# Altium PCB MAX976.PcbDoc
Units mm, origin at the board's own origin, x right, y up, seen from the top; angles counter-clockwise.
Board outline 49.66 x 42.55 mm, 2 copper layers (Top Layer, Bottom Layer); 4 components, 8 nets, 40 pads, 15 vias.
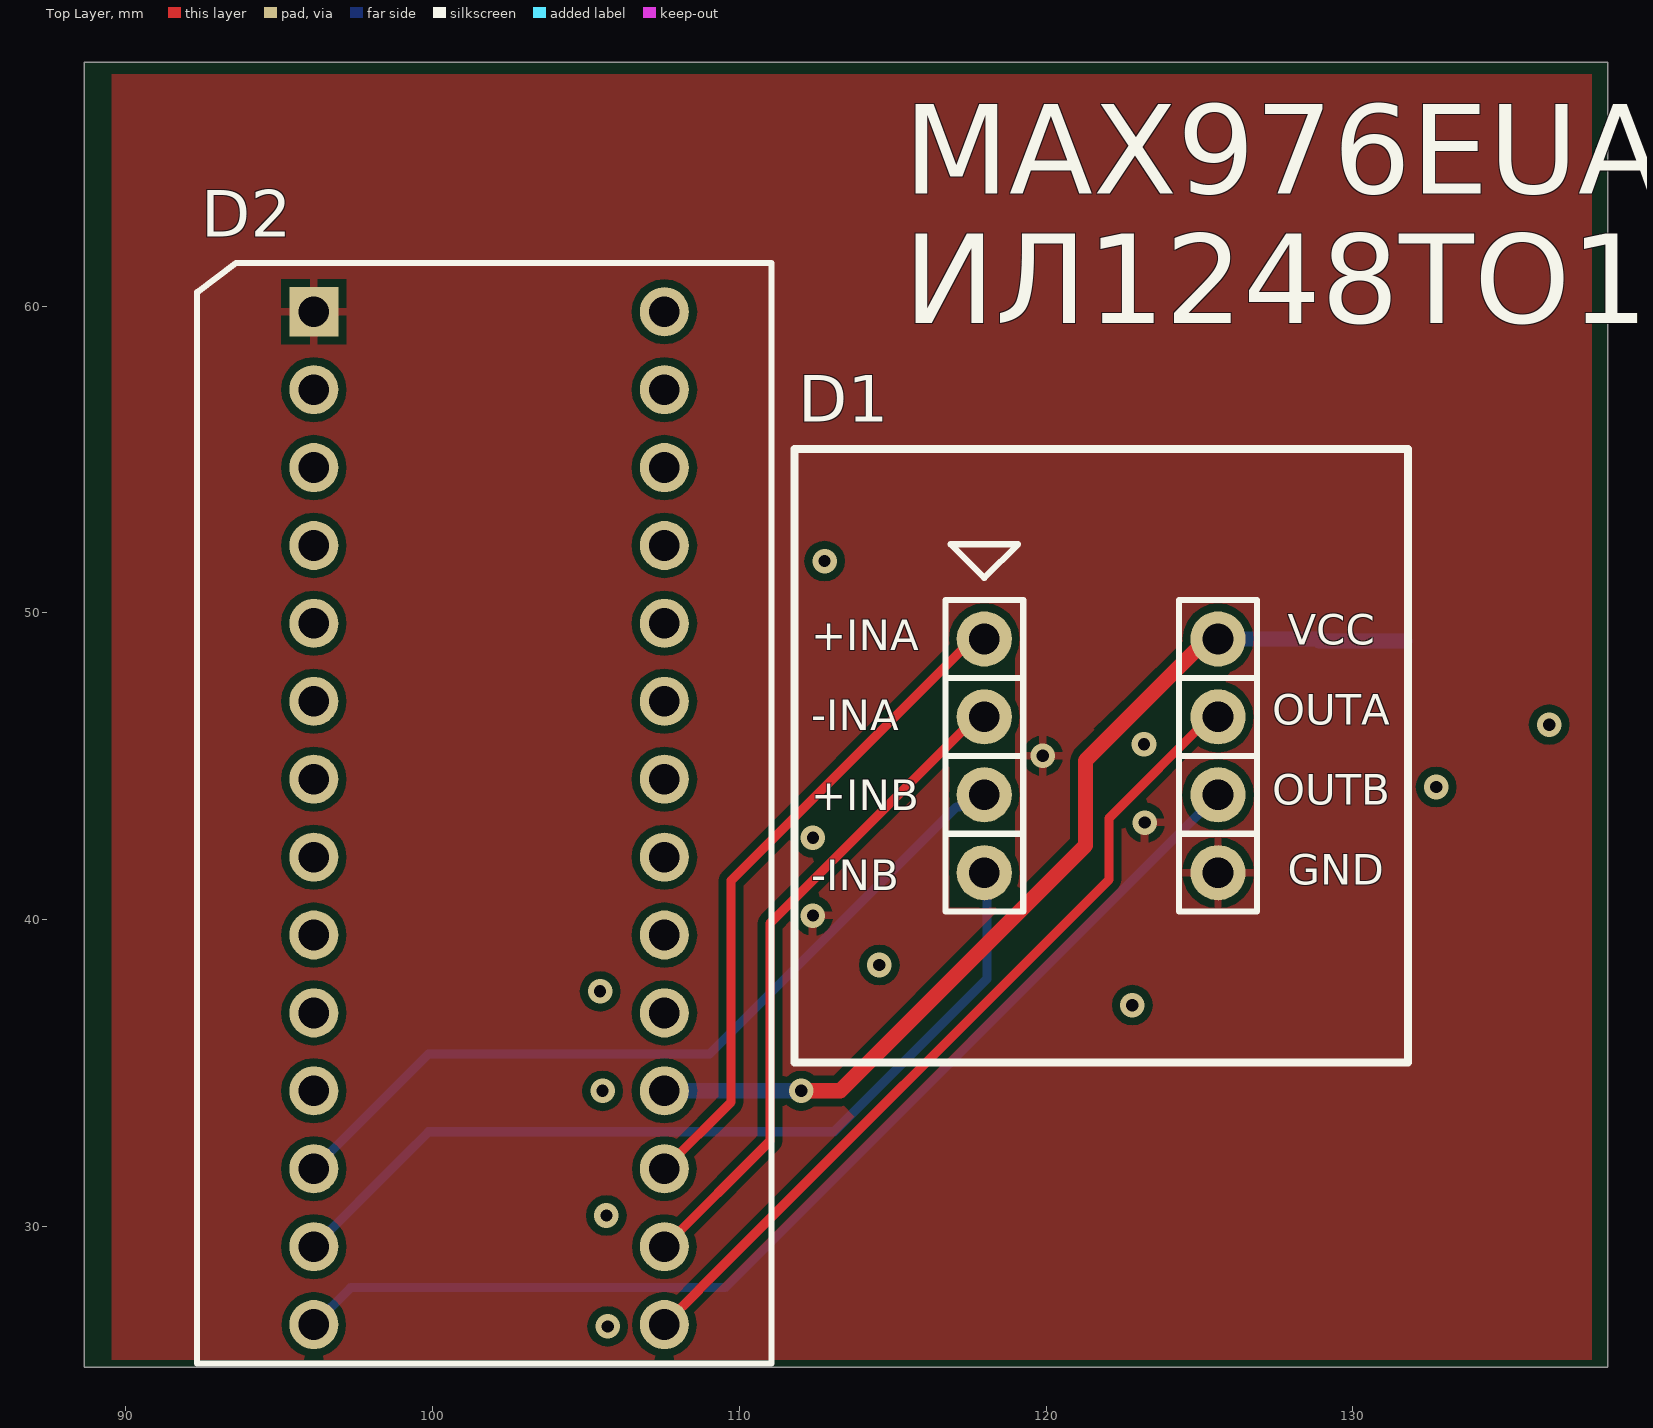
[diagram p0: Top Layer view]
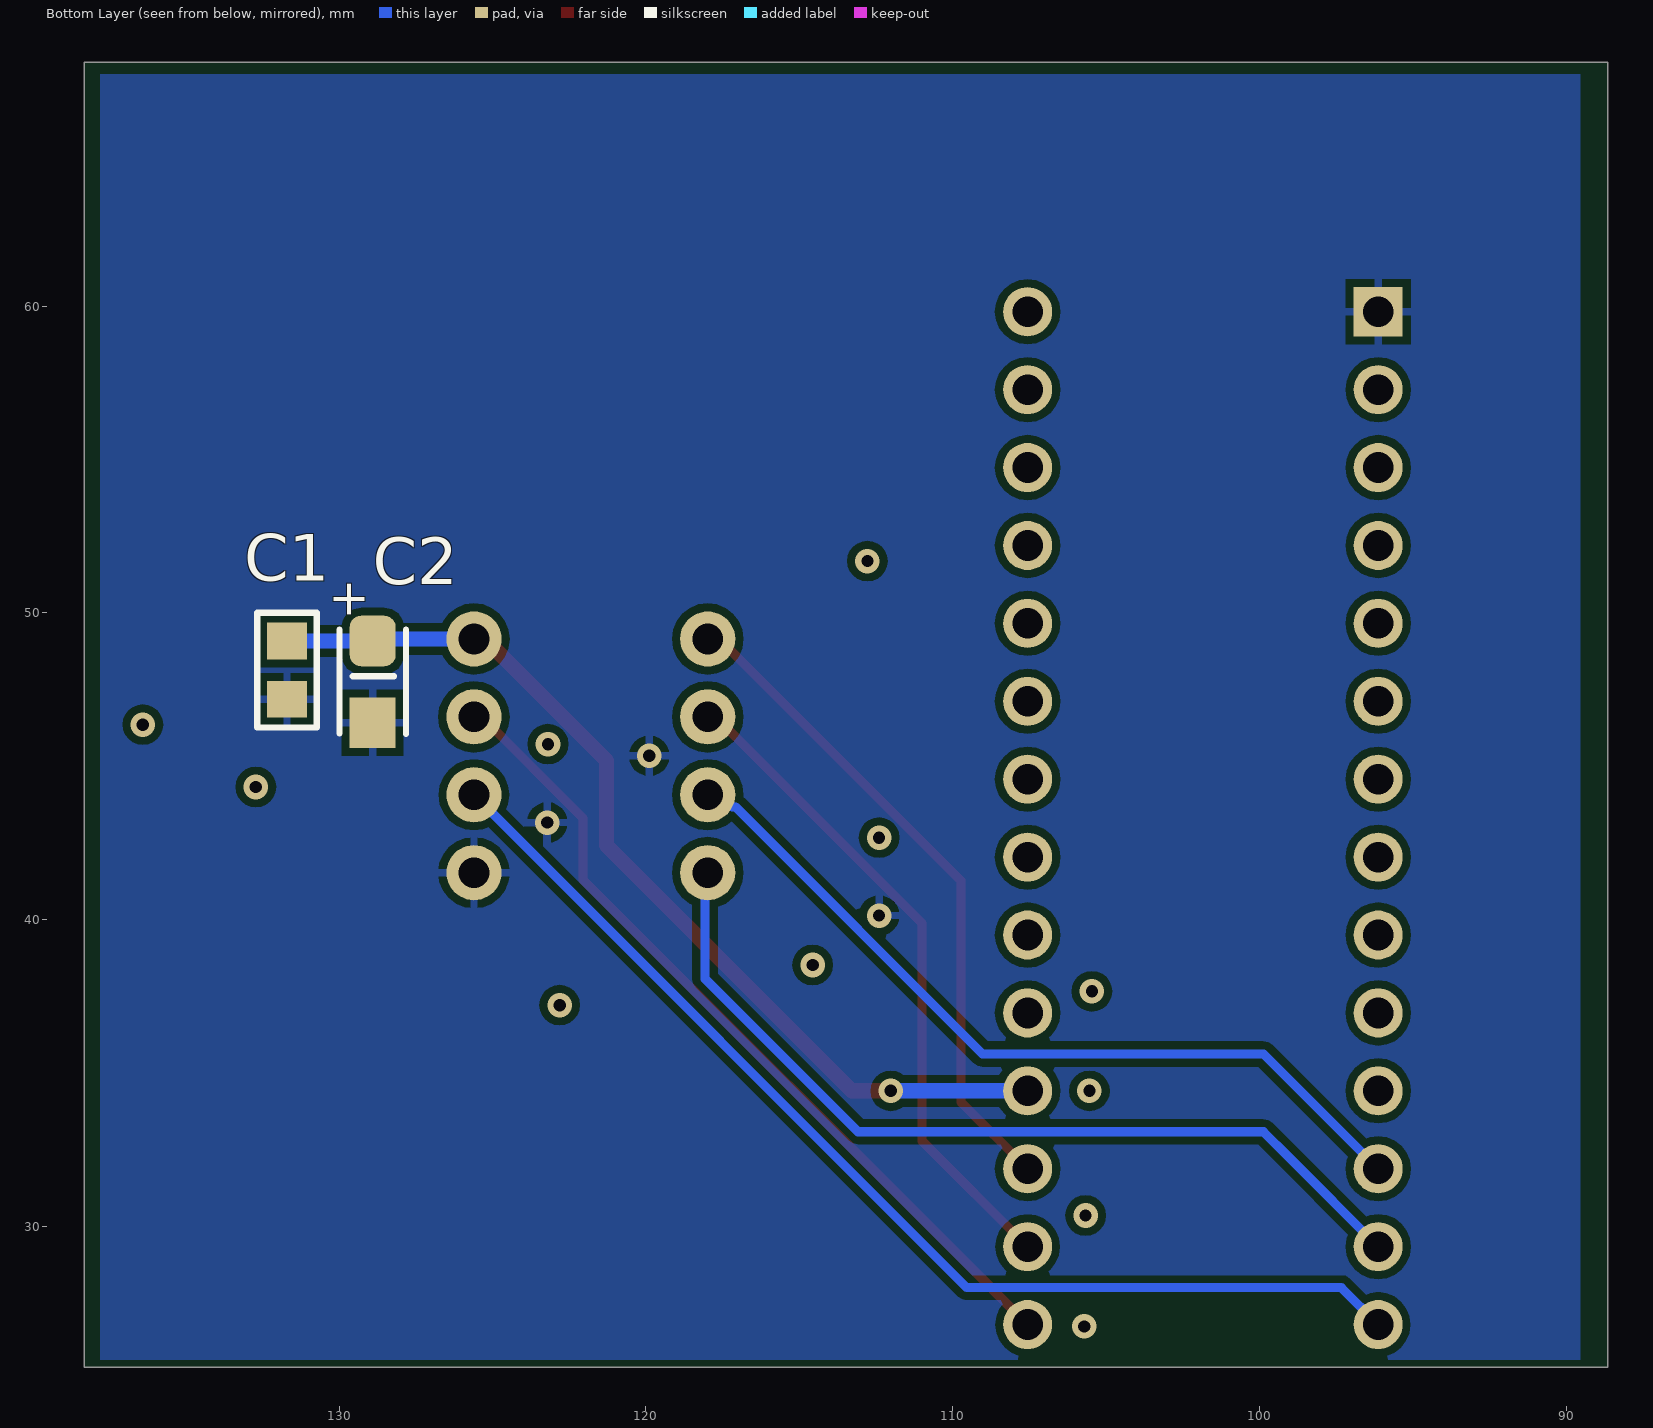
[diagram p1: Bottom Layer view, seen from below]

## Layer stack, top to bottom
Top Solder: solder mask 0.0102, Solder Resist, Dk 3.5
Top Layer: signal copper 0.0356
Dielectric 1: dielectric 0.32, FR-4, Dk 4.8
Bottom Layer: signal copper 0.0356
Bottom Solder: solder mask 0.0102, Solder Resist, Dk 3.5

## Board outline
88.646,25.4 138.303,25.4 138.303,67.945 88.646,67.945

## Design rules (kind name [scope] priority, off if disabled: settings)
Clearance [All] p1: gap=0.254 ignorepadtopadclearanceinfootprint=FALSE except(0: Arc-Hole Track-Hole SMDPad-Hole THPad-Hole Via-Hole Fill-Hole Poly-Hole Region-Hole Text-Hole)
PolygonConnect [All] p1: connectstyle=Relief reliefconductorwidth=0.254 reliefentries=4 polygonreliefangle="90 Angle" airgapwidth=0.254
RoutingVias [All] p1: holewidth=0.711 width=1.27 viastyle="Through Hole" minholewidth=0.711 minwidth=1.27 maxholewidth=0.711 maxwidth=1.27
SilkToSolderMaskClearance [IsPad] p1: minsilkscreentomaskgap=0.1 clearancetoexposedcopper=TRUE
SolderMaskExpansion [All] p1: expansion=0.102 istentingtop=FALSE
Width [All] p1: maxlimit=1 minlimit=0.2 preferedwidth=0.3
29 further rules are at their usual default settings.

## Components (designator, comment, footprint, x,y, rotation, side; value= is the part's Value field where it differs from the comment)
C1 "10uF" 0805 131.699,48.133 r90 bottom
C2 "4,7uF" TAJA 128.905,47.752 r270 bottom value=4.7uF
D1 "MAX976 (SO uMAX)" "SSOP to DIP8" 121.793,45.339 r0 top locked
D2 "FORMULA_OP" "Formula OY" 101.854,43.307 r0 top locked

## Footprints (in the part's own frame and the unit in brackets; to place one, negate y for a bottom-side part, rotate by r counter-clockwise, add the part's x,y. Pads: shape width x height; smd on the part's side, far side on the other; paste and mask are expansions set on the pad)
0805 [mm]
  rect 1.2x1.3 smd: 1(-0.95,0) 2(0.95,0)
  silkscreen extent -1.87,-0.97 1.87,0.97, body extent -1.05,-0.63 0.95,0.63, height 0.55
"Formula OY" [mm] "X?"
  rect 1.6x1.6 hole 1: 1(-5.73,16.51)
  round 1.6 hole 1: 2(-5.73,13.97) 3(-5.73,11.43) 4(-5.73,8.89) 5(-5.73,6.35) 6(-5.73,3.81) 7(-5.73,1.27) 8(-5.73,-1.27) 9(-5.73,-3.81) 10(-5.73,-6.35) 11(-5.73,-8.89) 12(-5.73,-11.43) 13(-5.73,-13.97) 14(-5.73,-16.51) 15(5.7,16.51) 16(5.7,13.97) 17(5.7,11.43) 18(5.7,8.89) 19(5.7,6.35) 20(5.7,3.81) 21(5.7,1.27) 22(5.7,-1.27) 23(5.7,-3.81) 24(5.7,-6.35) 25(5.7,-8.89) 26(5.7,-11.43) 27(5.7,-13.97) 28(5.7,-16.51)
  silkscreen extent -9.54,-17.78 9.19,18.1, body extent -7,-17.84 6.94,17.76, height 3
"SSOP to DIP8" [mm]
  round 1.8 hole 1: 1(-3.81,3.81) 2(-3.81,1.27) 3(-3.81,-1.27) 4(-3.81,-3.81) 5(3.81,-3.81) 6(3.81,-1.27) 7(3.81,1.27) 8(3.81,3.81)
  silkscreen extent -10,-10 10,10, body extent -5.04,-5.33 5.04,5.33, height 8.5
TAJA [mm]
  rrect50% 1.65x1.5 smd: 1(-1.33,0)
  rect 1.65x1.5 smd: 2(1.33,0)
  silkscreen extent -1.71,-1.08 1.7,1.08, body extent -1.89,-0.87 1.51,0.93, height 1.81

## Part data
C1: library part "Cap (0805) AVX", ComponentHeigt=1.3, Firme=AVX, KIND=Конденсатор, Leadform=SMD, Packaging=0805
C2: library part 293D475X9010A2TE3, Manufacturer="Vishay Intertechnology", Tolerance=±10%, Voltage=10V, ESR=5ohm, ID=7, Part Number=293D475X9010A2TE3, Published=23.04.2010, Publisher="Andrew Danich", Type=Конденсатор

## Via types
v1: diameter 0.8, hole 0.4, Top Layer to Bottom Layer, 15 vias

## Nets (pads, with @x,y where several pads share a name; then routed paths per layer and width w, separated by ;. In a path a pad name is that pad's centre, name@x,y a point inside that pad or via, vN(x,y) a via of type N, cw(c..) or ccw(c..) an arc to the next point about the centre after c; other vN are vias at no path point)
"+IN A": D1.1 D2.26 | length 21.8
  Top Layer w0.3: D2.26 109.728,34.051 109.728,41.275 117.602,49.149 D1.1
"+IN B": D1.3 D2.12 | length 26.9
  Bottom Layer w0.3: D2.12 99.868,35.621 109.027,35.621 117.074,43.668 117.177,43.668 117.577,44.069 D1.3
"-IN A": D1.2 D2.27 | length 21.7
  Top Layer w0.3: D2.27 110.998,32.781 110.998,39.878 117.729,46.609 D1.2
"-IN B": D1.4 D2.13 | length 29.1
  Bottom Layer w0.3: D2.13 99.045,32.258 99.868,33.081 113.085,33.081 118.067,38.063 118.067,41.445 D1.4
GND: C1.1 C2.2 D1.5 D2.1
  other v1: 112.395,40.132 123.214,43.164 119.888,45.339
"OUT A": D1.7 D2.28 | length 27.5
  Top Layer w0.3: D2.28 108.697,27.94 108.683,27.94 122.047,41.304 122.047,43.307 125.349,46.609 D1.7
"OUT B": D1.6 D2.14 | length 36.6
  Bottom Layer w0.3: D2.14 97.328,28.001 109.535,28.001 D1.6@125.571,44.037
  Bottom Layer w0.5: D1.6@125.571,44.037 D1.6
Vcc: C1.2 C2.1 D1.8 D2.25 | length 31.5
  Top Layer w0.5: v1(112.014,34.417) 113.284,34.417 121.285,42.418 121.285,45.183 D1.8@125.251,49.149
  Bottom Layer w0.5: D2.25 v1(112.014,34.417) ; D1.8 128.838,49.149 C2.1 C2.1 C1.2
pads on no net: D2.2 D2.3 D2.4 D2.5 D2.6 D2.7 D2.8 D2.9 D2.10 D2.11 D2.15 D2.16 D2.17 D2.18 D2.19 D2.20 D2.21 D2.22 D2.23 D2.24
copper on no net:
  other v1: 105.706,26.737 105.664,30.353 105.537,34.417 122.809,37.211 105.456,37.662 114.561,38.519 112.395,42.672 132.715,44.323 123.19,45.72 136.398,46.355 112.776,51.689

## Polygon pours and split planes (outlines as drawn)
GND on Bottom Layer "NONET_L-01_P-001" (solid, remove dead copper, pour order 0): 89.535,67.564 89.535,25.654 137.795,25.654 137.795,67.564
GND on Top Layer "NONET_L-01_P-001" (solid, remove dead copper, pour order 1): 89.535,67.564 89.535,25.654 137.795,25.654 137.795,67.564

## Other copper
Top Layer:
  pour cut-out: 116.84,48.514 118.999,48.514 118.999,40.386 116.84,40.386
  pour cut-out: 125.029,49.654 122.7,47.324 123.068,44.628 126.735,48.908
  pour cut-out: 116.078,45.72 117.221,45.72 117.221,48.006 116.078,47.371
  pour cut-out: 121.539,46.228 121.92,45.466 123.952,46.99 123.825,48.387
  pour cut-out: 113.259,34.061 113.944,33.376 122.047,41.656 121.539,42.164

## Silkscreen, mask and mechanical layers (free items; w line width, h text height)
Top Overlay:
  text "MAX976EUA+" at 115.361,62.706 h5
  text "ИЛ1248ТО1/1" at 115.361,58.477 h5
  text "VCC" at 127.878,48.959 h1
  text "+INA" at 112.339,48.776 h1
  text "OUTA" at 127.378,46.351 h1
  text "-INA" at 112.339,46.168 h1
  text "OUTB" at 127.378,43.743 h1
  text "+INB" at 112.339,43.56 h1
  text "GND" at 127.878,41.135 h1
  text "-INB" at 112.339,40.952 h1

## Text inside footprints (layer, text, board x,y; h text height)
C2: Bottom Overlay "+" at 130.568,51.115 h2 r90
D2: Mechanical 1 "2" at 106.708,61.311 h0.79 r270; Mechanical 1 "1" at 95.321,61.224 h0.79 r270